# Altium PCB CarnLog-26.PcbDoc (part 2 of 4)
Units mm, origin at the board's own origin, x right, y up, seen from the top; angles counter-clockwise.
Board outline 109.83 x 61.93 mm, 6 copper layers (Sig/Pwr/Gnd-1, Gnd-2, Sig/Pwr/Gnd-3, Sig/Pwr/Gnd-4, Gnd-5, Sig/Pwr-6), stack 1.491 mm thick; 183 components, 128 nets, 802 pads, 490 vias.
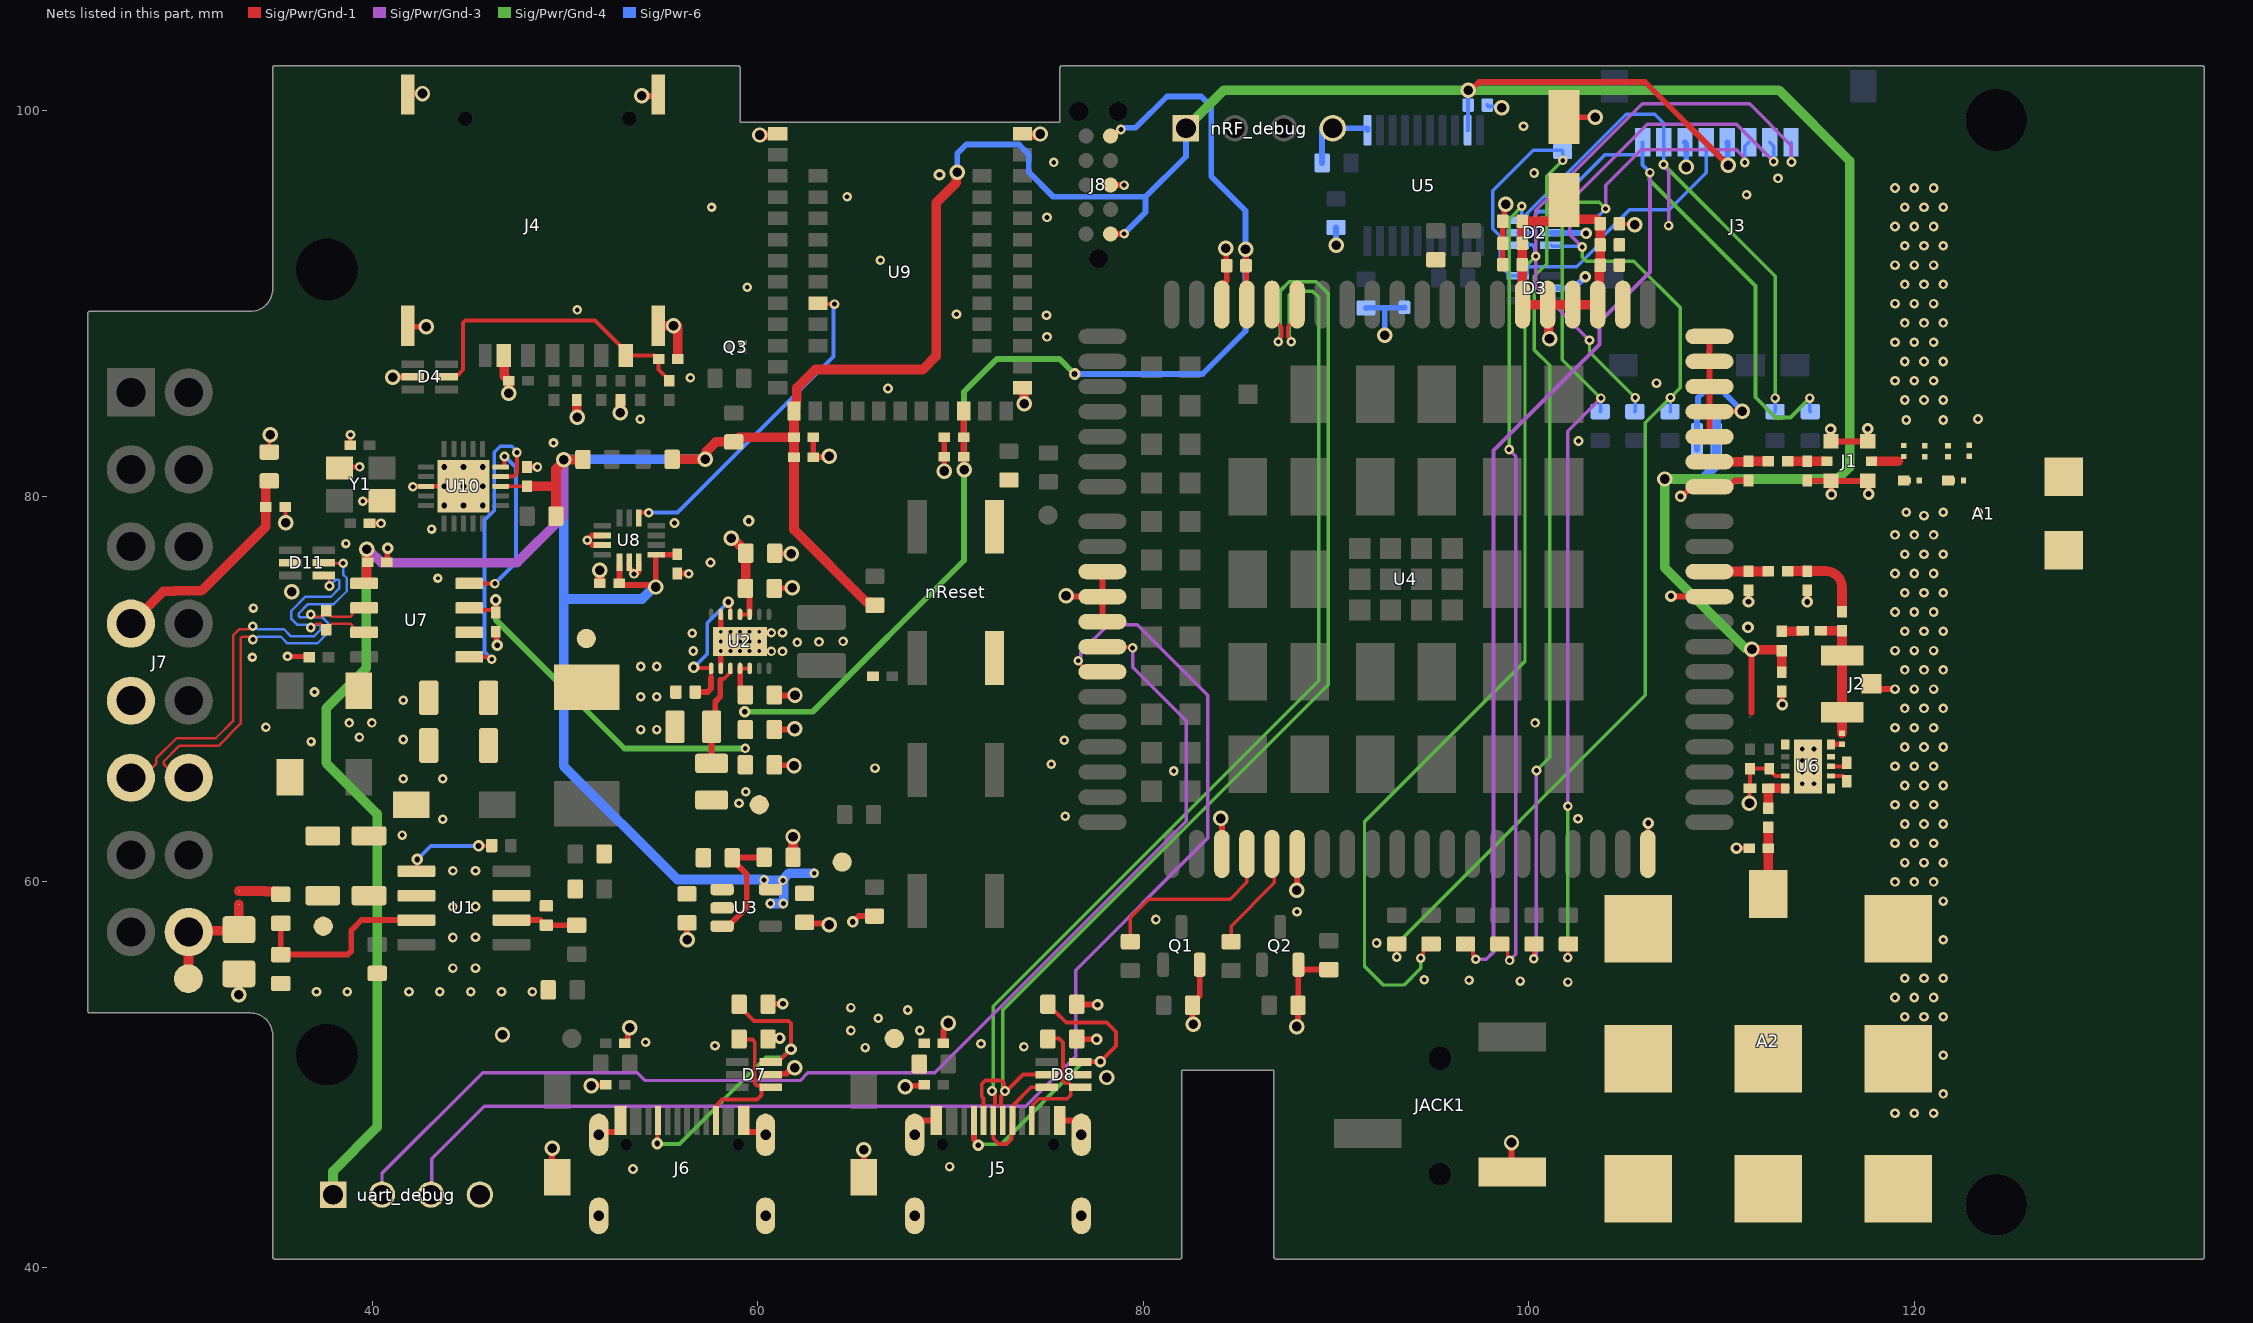
[diagram p6: the nets of this part, all layers, seen from the top]

## Part data
A1: library part P822601_1, "ANTENNA PRESTTA OCTABAND LTE", Manufacturer=Ethertronics, Part number IPS=00000009001, Part number NEMS=100700043, Part number Norautron=N.A., Artikkelnr Noca=N.A., Author=rsk, Component Class=Antennas, Component Status=Active, ComponentLink1Description=Datasheet, ComponentLink1URL=N.A., ComponentLink2Description="Supplier link", ComponentLink2URL=N.A., Footprint Doc=P822601, HelpURL=http://www.ethertronics.com/wp-content/uploads/2016/11/Prestta-P822601-P822602-Standard-Cellular-Octa-Band-20160904.pdf, LatestRevisionDate=2017-07-28, Manufacturer Part Number=P822601, Note=N.A., Pad Count=2, Part Number=P822601, PartId=100700043, Published=2017-07-28, Supplier 1=moreelectronics.dk, Supplier 2=Digi-Key, Supplier Part Number 1=P822601, Supplier Part Number 2=939-1057-1-ND
A2: library part DSGP.1575.18.4.C.02, "18 x 18 mm Low Profile GPS L1 / GALILEO E1 Passive Patch Antenna", Manufacturer=Taoglas, Part number IPS=00000007687, Part number NEMS=100700073, Part number Norautron=N.A., Artikkelnr Noca=N.A., Author=rubr, Component Class=Antennas, Component Status=Active, ComponentLink1Description=Datasheet, ComponentLink1URL=https://www.taoglas.com/datasheets/DSGP.1575.18.4.A.02.pdf, ComponentLink2Description="Supplier link", ComponentLink2URL=https://www.digikey.com/product-detail/en/taoglas-limited/DSGP.1575.18.4.A.02/931-1511-1-ND/8275289, Footprint Doc=DSGP.1575.18.4.C.02, HelpURL=https://www.taoglas.com/product/18184mm-dsgp-1575-184-gps-l1-galileo-e1-ceramic-patch-copy/?compare=16929, LatestRevisionDate=2023-01-01, Manufacturer Part Number=DSGP.1575.18.4.C.02, Note=N.A., Pad Count=2, Part Number=DSGP.1575.18.4.C.02, PartId=100700073, Published=2022-01-13, Supplier 1=N.A., Supplier 2=N.A., Supplier Part Number 1=N.A., Supplier Part Number 2=N.A.
C1 C16 C18 C23 C25 C27 C28 C46: library part CAP_0402, "Capacitor SMD 0402", LCSC NO=C77020, Manufacturer="Murata Electronics", MPN=GRM155R71H104KE14D, ComponentLink1Description="LCSC Link", ComponentLink1URL=https://lcsc.com/product-detail/Multilayer-Ceramic-Capacitors-MLCC-SMD-SMT_Murata-Electronics-GRM155R71H104KE14D_C77020.html?s_z=n_100nF
C2 C3 C4 C5: library part CAP_1206, "Capacitor SMD 1206"
C6 C8 C9 C10 C11 C12 C13 C14 C15 C26: library part CAP_0603, "Capacitor SMD 0603"
C7 C19 C20 C21 C22 C44 C45: library part CAP_0402, "Capacitor SMD 0402"
C17: library part CAP_0805, "Capacitor SMD 0805"
C24: library part EEEHA0J101WR, "CAPACITOR ALUM ELEC, 100UF, 20%, 6.3V, S; CAPACITOR ALUM ELEC, 100UF, 20%, 6.3V, SMD; Product Range:PANASONIC - HA Series; Capacitance:100ÂµF; Capacitance Tolerance:Â± 20%; Voltage Rating:6.3V; Capacitor Case Style:Radial Can - SMD; Diameter:5mm; Height:5.4mm; Series:HA", Package="RADIAL-2 Panasonic", Availability="In Stock", Check_prices=https://www.snapeda.com/parts/EEE-HA0J101WR/Panasonic%20Electronic%20Components/view-part/2733110/?ref=eda, MF="Panasonic Electronic", MP=EEE-HA0J101WR, Price=None, Purchase-URL=https://pricing.snapeda.com/search/part/EEE-HA0J101WR/?ref=eda, SnapEDA_Link=https://www.snapeda.com/parts/EEE-HA0J101WR/Panasonic%20Electronic%20Components/view-part/2733110/?ref=snap
C29: library part C0201-3.5p, "Capacitor, NP0, ±0.1pF, 25V", Manufacturer=Murata, Manufacturer Part Number=GJM0335C1H3R5BB01E, Part number IPS=00000001469, Part number NEMS=100200023, Part number Norautron=N.A., Artikkelnr Noca=N.A., Author=rsk, Component Class=Capacitors, Component Status=Active, ComponentLink1Description=Datasheet, ComponentLink1URL=N.A., ComponentLink2Description="Supplier link", ComponentLink2URL=N.A., Footprint Doc=0201, HelpURL=N.A., LatestRevisionDate=2019-02-22, Note=25V, Pad Count=2, Part Number=C0201-3.5p, PartId=100200023, Published=2019-02-22, Supplier 1=N.A., Supplier 2=N.A., Supplier Part Number 1=N.A., Supplier Part Number 2=N.A.
C30 C31 C40: library part C0402-N.C., "Not mounted", Manufacturer=N.A., Part number NEMS=100200105, Artikkelnr Noca=N.A., Assembly="Not mounted", Author=rsk, Component Class=Capacitors, Component Status=Active, ComponentLink1Description=Datasheet, ComponentLink1URL=N.A., ComponentLink2Description="Supplier link", ComponentLink2URL=N.A., Footprint Doc=0402, HelpURL=N.A., LatestRevisionDate=2009-05-08, Manufacturer Part Number=N.A., Note="Chip Cap", Pad Count=2, Part Number=C0402-N.C., Part number IPS=N.A., Part number Norautron=N.A., PartId=100200105, Published=2009-05-08, Supplier 1=N.A., Supplier 2=N.A., Supplier Part Number 1=N.A., Supplier Part Number 2=N.A.
C32 C33 C34: library part C0201-N.C., "Not mounted", Manufacturer=N.A., Part number NEMS=100200001, Artikkelnr Noca=N.A., Assembly="Not mounted", Author=rsk, Component Class=Capacitors, Component Status=Active, ComponentLink1Description=Datasheet, ComponentLink1URL=N.A., ComponentLink2Description="Supplier link", ComponentLink2URL=N.A., Footprint Doc=0201, HelpURL=N.A., LatestRevisionDate=2014-11-13, Manufacturer Part Number=N.A., Note="Chip Cap", Pad Count=2, Part Number=C0201-N.C., Part number IPS=N.A., Part number Norautron=N.A., PartId=100200001, Published=2014-11-13, Supplier 1=N.A., Supplier 2=N.A., Supplier Part Number 1=N.A., Supplier Part Number 2=N.A.
C35 C36 C38 C39 C41 C42 C43 C47 C48 C49 C50 C51 C52 C53 C54 C55 C56 C57 C58 C59 C60 C61 C62 C63 C64 C65 C66: library part C0402-4µ7, "Capacitor, X5R, ±20%", Manufacturer=N.A., Part number IPS="00000001251, 00000007165", Part number NEMS=100200193, Supplier Part Number 1=490-13252-1-ND, Artikkelnr Noca=20039482, Author=rsk, Component Class=Capacitors, Component Status=Active, ComponentLink1Description=Datasheet, ComponentLink1URL=N.A., ComponentLink2Description="Supplier link", ComponentLink2URL=N.A., Footprint Doc=0402, HelpURL=N.A., LatestRevisionDate=2017-11-09, Manufacturer Part Number=N.A., Note=10V, Pad Count=2, Part Number=C0402-4µ7, Part number Norautron=N.A., PartId=100200193, Published=2009-05-08, Supplier 1=Digi-Key, Supplier 2=N.A., Supplier Part Number 2=N.A.
C37: library part C0201-39p, "Capacitor, NP0, ±1%, 25V", Manufacturer=Murata, Manufacturer Part Number=GRM0335C1E390FA01, Part number IPS=00000001668, Part number NEMS=100200039, Part number Norautron=N.A., Artikkelnr Noca=N.A., Author=rsk, Component Class=Capacitors, Component Status=Active, ComponentLink1Description=Datasheet, ComponentLink1URL=N.A., ComponentLink2Description="Supplier link", ComponentLink2URL=N.A., Footprint Doc=0201, HelpURL=N.A., LatestRevisionDate=2019-04-16, Note=25V, Pad Count=2, Part Number=C0201-39p, PartId=100200039, Published=2019-04-16, Supplier 1=N.A., Supplier 2=N.A., Supplier Part Number 1=N.A., Supplier Part Number 2=N.A.
D1 D5 D6 D9 D10: library part "Schottky Diode_3", "Schottky Diode SMD SMAF package"
D2 D3 D4 D7 D8 D11: "Quint Uni-Directional TVS Diode, 100W, 6-Pin SC-88", Package="TSSOP-6 ProTek Devices", Availability="In Stock", Check_prices=https://www.snapeda.com/parts/SMF05C/Protek+Devices/view-part/?ref=eda, MF="ProTek Devices", MP=SMF05C, Price=None, SnapEDA_Link=https://www.snapeda.com/parts/SMF05C/Protek+Devices/view-part/?ref=snap
FB1 FB2: library part FB_0603, "Ferrite Bead SMD 0603"
J1: "Coaxial Connector with Switch", Manufacturer=Murata, Part number IPS=00000009955, Part number NEMS=100500400, Part number Norautron=26030338, Supplier Part Number 1=490-4981-1-ND, Artikkelnr Noca=55029011, Author=rsk, Component Class=Connectors, Component Status=Active, ComponentLink1Description=Datasheet, ComponentLink1URL=N.A., ComponentLink2Description="Supplier link", ComponentLink2URL=N.A., Footprint Doc=COAXIAL-SWF, HelpURL=http://www.murata.com/products/catalog/pdf/o33e.pdf, LatestRevisionDate=2014-04-24, Manufacturer Part Number=MM8130-2600, Note=N.A., Pad Count=3, Part Number=MM8130-2600, PartId=100500400, Published=2014-04-24, Supplier 1=Digi-Key, Supplier 2=Mouser, Supplier Part Number 2=81-MM8130-2600RA2, System=Connector
J2: library part 20279-001E-03, "Ultraminiature Coaxial Connector, 50 Ohm, SMD", Manufacturer=Wellshow, Part number IPS=00000004436, Part number NEMS=100500636, Part number Norautron=N.A., Artikkelnr Noca=N.A., Author=rsk, Component Class=Connectors, Component Status=Active, ComponentLink1Description=Datasheet, ComponentLink1URL=\\hizz\pro\app9717\Datasheet\connectors\Wellshow\20279C18.pdf, ComponentLink2Description="Supplier link", ComponentLink2URL=N.A., Footprint Doc="COAXIAL RF MHFI", HelpURL=N.A., LatestRevisionDate=2020-04-28, Manufacturer Part Number=20279-001E-03, Note=N.A., Pad Count=3, Part Number=20279-001E-03, PartId=100500636, Published=2020-01-07, Supplier 1=Cabcon, Supplier 2=Digi-Key, Supplier Part Number 1=20279-001E-03, Supplier Part Number 2=H11891DKR-ND, System=Connector
J3: "10 _8 + 2_ Position Card Connector Secure Digital - microSDâ„¢ Surface Mount, Right Angle Gold", Package=None, Availability=Unavailable, MF=Molex, MP=5025700893, Price=None, SnapEDA_Link=https://www.snapeda.com/parts/5025700893/Molex/view-part/379523/?ref=snap
J4: library part L-KLS1-SIM-066-(6+1)P-H1.37-R, "Nano SIM Card Connector, Push-Push, 6-Pin, H1.37mm, with CD Pin", Manufacturer="KLS Electronic", Part number IPS=N.A., Part number NEMS=100500776, Artikkelnr Noca=N.A., Author=rubr, Component Class=Connectors, Component Status=Active, ComponentLink1Description=Datasheet, ComponentLink1URL=https://klsele.com/admin/product_upload/20190123133741L-KLS1-SIM-066-(6+1)P-H1.37-R--.pdf, ComponentLink2Description="Supplier link", ComponentLink2URL=N.A., Footprint Doc=KLS1-SIM-066, HelpURL=https://klsele.com/products/connectors/SIM-card-connectors-Micro-SIM-card-connectors-Nano-SIM-Card-Connectors/4918.html, LatestRevisionDate=2023-01-01, Manufacturer Part Number=L-KLS1-SIM-066-(6+1)P-H1.37-R, Note=N.A., Pad Count=7, Part Number=L-KLS1-SIM-066-(6+1)P-H1.37-R, Part number Norautron=N.A., PartId=100500776, Published=2023-01-01, Supplier 1=Cabcon, Supplier 2=N.A., Supplier Part Number 1=L-KLS1-SIM-066-(6+1)P-H1.37-R, Supplier Part Number 2=N.A., System=Connector
J5 J6: "USB Type C Connector Horizontal SMT", Manufacturer="Koren Hroparts", Manufacturer Part Number=TYPE-C-31-M-12
J7: "OBD II 16pin 90 Degree Angle Male Plug Connector", Package=None, Check_prices=https://www.snapeda.com/parts/C-OBD-II-16M/Comtech+Electronic+Co.%252C+LTD/view-part/?ref=eda, MF="Comtech Electronic Co., LTD", MP=C-OBD-II-16M, SnapEDA_Link=https://www.snapeda.com/parts/C-OBD-II-16M/Comtech+Electronic+Co.%252C+LTD/view-part/?ref=snap
J8: library part TC2050-IDC-NLFP, "CBL PLUG-OF-NAILS 10-PIN", Manufacturer="Tag-Connect LLC", Part number IPS=N.A., Part number NEMS=100500463, Supplier Part Number 1=TC2050-IDC-NL-ND, Artikkelnr Noca=N.A., Author=rsk, Component Class=Connectors, Component Status=Active, ComponentLink1Description=Datasheet, ComponentLink1URL=N.A., ComponentLink2Description="Supplier link", ComponentLink2URL=N.A., Footprint Doc=TC2050-IDC-NLFP, HelpURL=http://www.tag-connect.com/Materials/TC2050-IDC%20Datasheet.pdf, LatestRevisionDate=2012-11-21, Manufacturer Part Number=TC2050-IDC-NLFP, Note=N.A., Pad Count=10, Part Number=TC2050-IDC-NLFP, Part number Norautron=N.A., PartId=100500463, Published=2012-11-21, Supplier 1=Digi-Key, Supplier 2=N.A., Supplier Part Number 2=N.A., System=Connector
JACK1: "3.5mm Headphone Jack SMD", LCSC NO=C18594, LCSC=https://lcsc.com/product-detail/Audio-Connectors_BOOMELE-Boom-Precision-Elec-PJ-320B_C18594.html?s_z=n_PJ320B, MF="Luoyang Dishang electronics", MP=PJ-320B
L1: library part ASPI-0630HI-6R8M-T15, "Inductor SMD 6.8uH 20% 8A Shielded", Manufacturer=ABRACON, Manufacturer Part Number=ASPI-0630HI-6R8M-T15
L2: library part IND_1008, "Inductor SMD 1008"
L3: library part L0201-1n5-HQ-Murata, "Inductor, 1000mA, ±0.1ｎH, 50mOhm", Manufacturer=Murata, Manufacturer Part Number=LQP03HQ1N5B02, Part number IPS=N.A., Part number NEMS=100300202, Supplier Part Number 1=490-13881-1-ND, Artikkelnr Noca=N.A., Author=rsk, Component Class=Inductors, Component Status=Active, ComponentLink1Description=Datasheet, ComponentLink1URL=https://search.murata.co.jp/Ceramy/image/img/P02/JELF243C-0021.pdf, ComponentLink2Description="Supplier link", ComponentLink2URL=N.A., Footprint Doc=0201, HelpURL=https://psearch.en.murata.com/inductor/product/LQP03HQ1N5B02%23.html, LatestRevisionDate=2018-10-23, Note="-55°C ~ 125°C", Pad Count=2, Part Number=L0201-1n5-HQ-Murata, Part number Norautron=N.A., PartId=100300202, Published=2018-10-23, Supplier 1=Digi-Key, Supplier 2=N.A., Supplier Part Number 2=N.A.
L4: library part L0201-22n, "Chip Inductor", Manufacturer=N.A., Part number IPS=00000001478, Part number NEMS=100300034, Artikkelnr Noca=N.A., Author=rsk, Component Class=Inductors, Component Status=Active, ComponentLink1Description=Datasheet, ComponentLink1URL=N.A., ComponentLink2Description="Supplier link", ComponentLink2URL=N.A., Footprint Doc=0201, HelpURL=N.A., LatestRevisionDate=2019-08-29, Manufacturer Part Number=N.A., Note="High frequency chip inductor ±10%", Pad Count=2, Part Number=L0201-22n, Part number Norautron=N.A., PartId=100300034, Published=2013-04-10, Supplier 1=N.A., Supplier 2=N.A., Supplier Part Number 1=N.A., Supplier Part Number 2=N.A.
L5: library part L0402-68n-Wirewound-Murata, "Inductor, 140mA, ±2%, 1960mΩ, Q=20", Manufacturer=Murata, Manufacturer Part Number=LQW15AN68NG00, Part number IPS=00000002494, Part number NEMS=100300389, Part number Norautron=N.A., Supplier Part Number 1=490-6837-1-ND, Artikkelnr Noca=N.A., Author=rsk, Component Class=Inductors, Component Status=Active, ComponentLink1Description=Datasheet, ComponentLink1URL=https://search.murata.co.jp/Ceramy/image/img/P02/JELF243A-0050.pdf, ComponentLink2Description="Supplier link", ComponentLink2URL=N.A., Footprint Doc=0402, HelpURL=https://psearch.en.murata.com/inductor/product/LQW15AN68NG00%23.html, LatestRevisionDate=2019-04-16, Note="-55°C ~ 125°C", Pad Count=2, Part Number=L0402-68n-Wirewound-Murata, PartId=100300389, Published=2019-04-16, Supplier 1=Digi-Key, Supplier 2=N.A., Supplier Part Number 2=N.A.
L6: library part L0402-9n1-Wirewound-Murata, "Inductor, 540mA, ±2%, 140mΩ, Q=25", Manufacturer=Murata, Manufacturer Part Number=LQW15AN9N1G00, Part number IPS=00000002497, Part number NEMS=100300357, Part number Norautron=N.A., Supplier Part Number 1=490-6854-1-ND, Artikkelnr Noca=N.A., Author=rsk, Component Class=Inductors, Component Status=Active, ComponentLink1Description=Datasheet, ComponentLink1URL=https://search.murata.co.jp/Ceramy/image/img/P02/JELF243A-0050.pdf, ComponentLink2Description="Supplier link", ComponentLink2URL=N.A., Footprint Doc=0402, HelpURL=https://psearch.en.murata.com/inductor/product/LQW15AN9N1G00%23.html, LatestRevisionDate=2019-04-16, Note="-55°C ~ 125°C", Pad Count=2, Part Number=L0402-9n1-Wirewound-Murata, PartId=100300357, Published=2019-04-16, Supplier 1=Digi-Key, Supplier 2=N.A., Supplier Part Number 2=N.A.
L7: library part L0402-N.C., "Not mounted", Manufacturer=N.A., Part number NEMS=100300037, Artikkelnr Noca=N.A., Assembly="Not mounted", Author=rsk, Component Class=Inductors, Component Status=Active, ComponentLink1Description=Datasheet, ComponentLink1URL=N.A., ComponentLink2Description="Supplier link", ComponentLink2URL=N.A., Footprint Doc=0402, HelpURL=N.A., LatestRevisionDate=2016-11-24, Manufacturer Part Number=N.A., Note=N.A., Pad Count=2, Part Number=L0402-N.C., Part number IPS=N.A., Part number Norautron=N.A., PartId=100300037, Published=2016-11-24, Supplier 1=N.A., Supplier 2=N.A., Supplier Part Number 1=N.A., Supplier Part Number 2=N.A.
N_STS1 STS1: library part LED_0603_RED, "LED 0603 RED SMD"
nReset usb_boot: "White Push Plate Tactile Switch, SPST-NO 20 mA 3.1mm", Package=None, Availability="In Stock", Check_prices=https://www.snapeda.com/parts/EVQQ2W03W/Panasonic/view-part/?ref=eda, MF=Panasonic, MP=EVQQ2W03W, Price=None, SnapEDA_Link=https://www.snapeda.com/parts/EVQQ2W03W/Panasonic/view-part/?ref=snap
nRF_debug uart_debug: library part 4PIN_TSW-104-08-T-S-LL, Package=None, Availability=Unavailable, MF=Samtec, MP=TSW-104-08-T-S-LL, Price=None
nRF_LED: library part LED_0603_BLUE, "LED 0603 BLUE SMD"
Q1 Q2: "NPN SMALL SIGNAL SURFACE MOUNT TRANSISTOR", Package=None, Availability=Unavailable, MP=MMBT3904-7-F, Price=None
Q3: "N-Channel MOSFET, 20V, 1A, 470mOhm, 400mW", Manufacturer="Rohm Semiconductor", Part number IPS=00000009976, Part number NEMS=101300132, Part number Norautron=26320026, Supplier Part Number 1=RV2C010UNT2LCT-ND, Artikkelnr Noca=35010020, Author=rsk, Component Class=Semiconductors, Component Status=Active, ComponentLink1Description=Datasheet, ComponentLink1URL=N.A., ComponentLink2Description="Supplier link", ComponentLink2URL=N.A., Footprint Doc=DFN-3, HelpURL=http://rohmfs.rohm.com/en/products/databook/datasheet/discrete/transistor/mosfet/rv2c010unt2l-e.pdf, LatestRevisionDate=2016-08-09, Manufacturer Part Number=RV2C010UNT2L, Note=N.A., Pad Count=3, Part Number=RV2C010UNT2L, PartId=101300132, Published=2016-08-09, Supplier 1=Digi-Key, Supplier 2=Mouser, Supplier Part Number 2=755-RV2C010UNT2L
R1 R2 R3 R4 R5 R6 R8 R10 R11 R12 R13 R14 R15 R16 R17 R19 R20 R21 R22 R26 R27 R28 R29 R30 R31 R32 R33 R34 R35 R36 R37 R42 R43 R44 R45 R46 R47 R53 R54 R55 R56: library part RES_0603, "Resistor SMD 0603"
R7 R9: library part RES_0805, "Resistor SMD 0805"
R18 R23 R24 R25 R38 R39 R40 R41 R48 R52: library part R0402-0R, "Resistor, ±5%, 0.063W", Manufacturer=N.A., Part number IPS=00000007128, Part number NEMS=100100109, Supplier Part Number 1=146-9661, Artikkelnr Noca=27049000, Author=rsk, Component Class=Resistors, Component Status=Active, ComponentLink1Description=Datasheet, ComponentLink1URL=N.A., ComponentLink2Description="Supplier link", ComponentLink2URL=N.A., Footprint Doc=0402, HelpURL=N.A., LatestRevisionDate=2009-11-23, Manufacturer Part Number=N.A., Note="Chip Res 5%", Pad Count=2, Part Number=R0402-0R, Part number Norautron=N.A., PartId=100100109, Published=2009-05-08, Supplier 1=Farnell, Supplier 2=N.A., Supplier Part Number 2=N.A.
SB1: library part "Solderbridge Shorted", "Shorted Solderbridge", Manufacturer=N.A., Part number NEMS=100500459, Artikkelnr Noca=N.A., Author=rsk, Component Class=Connectors, Component Status=Active, ComponentLink1Description=Datasheet, ComponentLink1URL=N.A., ComponentLink2Description="Supplier link", ComponentLink2URL=N.A., Footprint Doc=Solderbridge_Shorted, HelpURL=N.A., LatestRevisionDate=2012-08-07, Manufacturer Part Number=N.A., Note=N.A., Pad Count=2, Part Number="Solderbridge Shorted", Part number IPS=N.A., Part number Norautron=N.A., PartId=100500459, Published=2012-08-07, Supplier 1=N.A., Supplier 2=N.A., Supplier Part Number 1=N.A., Supplier Part Number 2=N.A., System=Connector
SB2 SB3 SB4: Manufacturer=N.A., Part number NEMS=100500458, Artikkelnr Noca=N.A., Author=rsk, Component Class=Connectors, Component Status=Active, ComponentLink1Description=Datasheet, ComponentLink1URL=N.A., ComponentLink2Description="Supplier link", ComponentLink2URL=N.A., Footprint Doc=Solderbridge, HelpURL=N.A., LatestRevisionDate=2009-12-14, Manufacturer Part Number=N.A., Note=N.A., Pad Count=2, Part Number=Solderbridge, Part number IPS=N.A., Part number Norautron=N.A., PartId=100500458, Published=2009-12-14, Supplier 1=N.A., Supplier 2=N.A., Supplier Part Number 1=N.A., Supplier Part Number 2=N.A., System=Connector
TP1 TP2 TP5 TP6 TP9 TP10 TP11: library part TP_SMD_Ø1.0MM, "1.0mm circular SMD testpad", Manufacturer="Nordic Semiconductor", Manufacturer Part Number=N.A., Part number NEMS=100500475, Artikkelnr Noca=N.A., Author=rsk, Component Class=Connectors, Component Status=Active, ComponentLink1Description=Datasheet, ComponentLink1URL=N.A., ComponentLink2Description="Supplier link", ComponentLink2URL=N.A., Footprint Doc=TP_SMD_Ø1.0mm, HelpURL=N.A., LatestRevisionDate=2021-03-05, Note=N.A., Pad Count=1, Part Number=TP_SMD_Ø1.0MM, Part number IPS=N.A., Part number Norautron=N.A., PartId=100500475, Published=2013-06-11, Supplier 1=N.A., Supplier 2=N.A., Supplier Part Number 1=N.A., Supplier Part Number 2=N.A.
TP14: library part TP_SMD_Ø1.5MM, "1.5mm circular SMD testpad", Manufacturer="Nordic Semiconductor", Manufacturer Part Number=N.A., Part number NEMS=100500477, Artikkelnr Noca=N.A., Author=rsk, Component Class=Connectors, Component Status=Active, ComponentLink1Description=Datasheet, ComponentLink1URL=N.A., ComponentLink2Description="Supplier link", ComponentLink2URL=N.A., Footprint Doc=TP_SMD_Ø1.5mm, HelpURL=N.A., LatestRevisionDate=2021-03-05, Note=N.A., Pad Count=1, Part Number=TP_SMD_Ø1.5MM, Part number IPS=N.A., Part number Norautron=N.A., PartId=100500477, Published=2016-06-02, Supplier 1=N.A., Supplier 2=N.A., Supplier Part Number 1=N.A., Supplier Part Number 2=N.A.
U2: "High Efficiency Single Inductor Buck-Boost Converter with 4A Switch", Package="VSON-14 Texas Instruments", Check_prices=https://www.snapeda.com/parts/TPS63020DSJT/Texas+Instruments/view-part/?ref=eda, MF="Texas Instruments", MP=TPS63020DSJT, SnapEDA_Link=https://www.snapeda.com/parts/TPS63020DSJT/Texas+Instruments/view-part/?ref=snap
U3: "1-A, low-IQ, high-accuracy, low-dropout voltage regulator with enable", Package="SOT-23-5 Texas Instruments", Availability="In Stock", Check_prices=https://www.snapeda.com/parts/TLV75733PDBVR/Texas+Instruments/view-part/?ref=eda, MF="Texas Instruments", MP=TLV75733PDBVR, Price=None, Purchase-URL=https://pricing.snapeda.com/search/part/TLV75733PDBVR/?ref=eda, SnapEDA_Link=https://www.snapeda.com/parts/TLV75733PDBVR/Texas+Instruments/view-part/?ref=snap
U4: "Quectel 4G LTE Cat 1 wireless BT GNSS module", Package=None, Check_prices=https://www.snapeda.com/parts/EC200UCNAA-N05-SGNSA/Quectel/view-part/?ref=eda, MF=Quectel, MP=EC200UCNAA-N05-SGNSA, SnapEDA_Link=https://www.snapeda.com/parts/EC200UCNAA-N05-SGNSA/Quectel/view-part/?ref=snap
U5: "8-bit bidirectional voltage-level shifter for open-drain and push-pull application", Package="TSSOP-20 Texas Instruments", Availability="In Stock", Check_prices=https://www.snapeda.com/parts/TXS0108EPWR/Texas+Instruments/view-part/?ref=eda, MF="Texas Instruments", MP=TXS0108EPWR, Price=None, Purchase-URL=https://pricing.snapeda.com/search/part/TXS0108EPWR/?ref=eda, SnapEDA_Link=https://www.snapeda.com/parts/TXS0108EPWR/Texas+Instruments/view-part/?ref=snap
U6: "GNSS Low-Noise Amplifier Front-End Module with Integrated Pre-Filter and Post-Filter", Manufacturer=Skyworks, Part number IPS=00000002997, Part number NEMS=101900584, Part number Norautron=N.A., Supplier Part Number 1=863-2032-1-ND, Artikkelnr Noca=N.A., Author=rsk, Component Class=Misc_ICs, Component Status=Active, ComponentLink1Description=Datasheet, ComponentLink1URL=http://www.skyworksinc.com/uploads/documents/SKY65943_11_204404F.pdf, ComponentLink2Description="Supplier link", ComponentLink2URL=https://www.digikey.com/product-detail/en/skyworks-solutions-inc/SKY65943-11/863-2032-1-ND, Footprint Doc=MCM-10, HelpURL=http://www.skyworksinc.com/Product/3579/SKY65943-11, LatestRevisionDate=2019-04-16, Manufacturer Part Number=SKY65943-11, Note=N.A., Pad Count=10, Part Number=SKY65943-11, PartId=101900584, Published=2019-04-16, Supplier 1=Digi-Key, Supplier 2=Mouser, Supplier Part Number 2=873-SKY65943-11
U7: "5Mbps CAN Transceiver SOIC-8 CAN Transceivers ROHS"
U8: "Accelerometer, Gyroscope, 6 Axis Sensor I2C, SPI Output", Package="VFLGA-14 STMicroelectronics", Check_prices=https://www.snapeda.com/parts/LSM6DSOTR/STMicroelectronics/view-part/?ref=eda, MF=STMicroelectronics, MP=LSM6DSOTR, SnapEDA_Link=https://www.snapeda.com/parts/LSM6DSOTR/STMicroelectronics/view-part/?ref=snap
U9: "Holyiot 18010 Nordic nRF52840 module Bluetooth low energy module", Package=Package, Check_prices=https://www.snapeda.com/parts/HOLYIOT-18010-NRF52840/Holyiot/view-part/?ref=eda, MF=Holyiot, MP=HOLYIOT-18010-NRF52840, SnapEDA_Link=https://www.snapeda.com/parts/HOLYIOT-18010-NRF52840/Holyiot/view-part/?ref=snap
U10: "Microchip MCP2515-I/ML, CAN Controller 1Mbit/s CAN 2.0B, 20-Pin QFN", Package="VFQFN-20 Microchip", Check_prices=https://www.snapeda.com/parts/MCP2515-I/ML/Microchip+Technology/view-part/?ref=eda, MF="Microchip Technology", MP=MCP2515-I/ML, SnapEDA_Link=https://www.snapeda.com/parts/MCP2515-I/ML/Microchip+Technology/view-part/?ref=snap
Y1: library part C3E-8.000-18-3030-X-R, "Crystal, 3.20mm x2.50mm,8MHz,18pF,-40-85C", Package="SMD-4 Aker", Check_prices=https://www.snapeda.com/parts/C3E-8.000-18-3030-X-R/Aker/view-part/?ref=eda, MF="Aker Technology USA", MP=C3E-8.000-18-3030-X-R, SnapEDA_Link=https://www.snapeda.com/parts/C3E-8.000-18-3030-X-R/Aker/view-part/?ref=snap

## Free pads (board coordinates)
  round 3.2 hole 3.2 unplated: 1(37.65,91.775) 2(37.65,51.025) 3(124.25,43.25) 4(124.25,99.525)

## Via types
v1: diameter 0.5, hole 0.25, Sig/Pwr/Gnd-1 to Sig/Pwr-6, tented both sides, 370 vias
v2: diameter 0.8, hole 0.5, Sig/Pwr/Gnd-1 to Sig/Pwr-6, tented both sides, 64 vias
v3: diameter 0.6, hole 0.3, Sig/Pwr/Gnd-1 to Sig/Pwr-6, tented both sides, 46 vias
v4: diameter 0.5, hole 0.2, Sig/Pwr/Gnd-1 to Sig/Pwr-6, tented both sides, 10 vias

## Nets (pads, with @x,y where several pads share a name; then routed paths per layer and width w, separated by ;. In a path a pad name is that pad's centre, name@x,y a point inside that pad or via, vN(x,y) a via of type N, cw(c..) or ccw(c..) an arc to the next point about the centre after c; other vN are vias at no path point)
+3V3: C14.2 C28.2 C35.2 C44.2 C45.2 C46.2 C57.2 C58.2 C59.2 C61.1 C63.2 C64.2 J3.4 J8.1 nRF_debug.01 R23.2 R46.2 R47.1 R54.2 R55.2 R56.1 SB1.1 TP6.1 U3.5 U5.19 U7.5 U8.5 U8.8 U9.14 U10.18 uart_debug.01 | length 274
  Sig/Pwr/Gnd-1 w0.2: U10.18@46.66,80.525 C59.2@48.025,80.525
  Sig/Pwr/Gnd-1 w0.3: U8.5@52.825,76.575 52.825,75.525 C58.2@52.8,75.5 52.9,75.4 54.465,75.4 54.565,75.3 v2(54.7,75.3) U8.8@54.7,76.975 ; U8.8@54.675,76.975 U8.8@54.7,76.975 ; C61.1@55.825,77 55.8,76.975 U8.8@54.725,76.975 U8.8@54.7,76.975 ; J8.1@78.3,93.615 78.305,93.62 78.995,93.62 v1(79,93.625) ; v2(96.85,101.075) 96.985,101.075 97.41,101.5 106.025,101.5 v2(110.35,97.175) ; 111.55,68.775 v2@111.55,72.05
  Sig/Pwr/Gnd-1 w0.5: U7.5@39.575,75.483 39.65,75.483 39.7,75.533 39.7,76.575 39.725,76.575 39.725,77.225 v2(39.7,77.25) ; C59.2@48.069,80.535 48.269,80.535 49.525,80.528 ; R56.1@49.525,78.975 49.525,80.528 ; R55.2@50.925,81.919 50.915,81.91 49.936,81.91 v2(49.927,81.9) 49.927,81.819 49.525,81.417 49.525,80.528 ; R54.2@55.55,81.925 v2(57.275,81.925) 57.332,81.982 57.332,82.332 57.825,82.825 R46.2@58.75,82.825 59,83.075 C64.2@61.875,83.075 ; R47.1@66.075,74.35 65.925,74.5 65.65,74.5 61.875,78.275 C63.2@61.875,82.025 C64.2@61.875,83.075 ; v2(70.35,96.825) 70.299,96.774 70.299,96.274 69.25,95.225 69.25,87.275 68.556,86.581 62.982,86.581 62.025,85.624 62.025,84.968 61.975,84.918 61.975,84.525 U9.14@61.875,84.425 C64.2@61.875,83.075 ; v2@111.55,72.05 v2(111.575,72.075) 111.612,72.037 113.1,72.037 113.125,72.012 R23.2@113.125,72 C35.2@113.125,70.875
  Sig/Pwr/Gnd-3 w0.5: v2@39.744,77.193 39.839,77.193 40.471,76.56 47.511,76.56 49.903,78.951 49.903,81.876 v2(49.927,81.9)
  Sig/Pwr/Gnd-4 w0.5: uart_debug.01@37.96,43.775 37.96,44.985 40.25,47.275 40.25,63.525 37.6,66.175 37.6,69 39.686,71.086 v2@39.686,77.264 ; nRF_debug.01@81.824,98.724 81.834,98.724 nRF_debug.01@82.21,99.1 82.645,99.535 82.645,99.545 84.175,101.075 v2(96.85,101.075) 112.975,101.075 116.65,97.4 116.65,81.525 116.025,80.9 v2(107.05,80.9) 107.05,76.3 111.218,72.132 111.518,72.132 v2(111.575,72.075)
  Sig/Pwr-6 w0.2: U5.19@96.825,98.995 96.837,99.007 96.837,100.287 C28.2@96.85,100.3 v2(96.85,101.075)
  Sig/Pwr-6 w0.3: v2(70.35,96.825) 70.35,97.789 70.811,98.25 73.55,98.25 74.05,97.75 74.05,96.825 75.325,95.55 78.867,95.55 78.876,95.541 80.116,95.541 ; v1(79,93.625) 80.116,94.741 80.116,95.541 ; nRF_debug.01@82.21,99.1 82.21,97.635 80.116,95.541 ; J3.4@110.3,98.375 110.325,98.35 110.325,97.2 v2(110.35,97.175)
  Sig/Pwr-6 w0.5: v2(49.927,81.9) 49.927,74.674 ; v2@49.952,81.925 v2(57.275,81.925) ; v2(54.7,75.3) 54.619,75.3 53.993,74.674 49.927,74.674 ; v1(60.65,58.875) v1(61.325,58.875) 61.35,58.9 61.35,60.025 v1(61.3,60.075) ; v1(62.925,60.45) 61.625,60.45 61.3,60.125 v1(61.3,60.075) ; v2(107.05,80.9) 109,80.9 109.725,81.625 C46.2@109.725,82.425 C45.2@109.725,83.45 C44.2@109.725,84.425 ; 49.927,74.674 49.927,66.023 55.827,60.123 60.302,60.123 v1(60.325,60.1) 60.375,60.1 60.4,60.075 v1(61.3,60.075)
+4V: C4.2 C5.2 C9.2 C10.2 C15.2 C18.2 C19.2 C20.2 C21.2 C22.2 C23.2 C24.1 L1.2 R2.2 R6.2 TP2.1 U2.10 U2.11 U3.1 U4.57 U4.58 U4.59 U4.60 | length 24.8
  Sig/Pwr/Gnd-1 w0.2: U2.11@59.075,73.875 U2.10@59.575,73.875 U2.10@59.567,73.883 ; C10.2@59.35,75.225 C10.2@59.567,75.008
  Sig/Pwr/Gnd-1 w0.3: U2.10@59.567,73.883 C10.2@59.567,75.008
  Sig/Pwr/Gnd-1 w0.5: v2(58.625,77.825) 58.7,77.825 59.375,77.15 C9.2@59.375,77.05 59.363,77.038 59.363,75.238 C10.2@59.35,75.225 ; v2(101.075,88.175) 101.025,88.225 101.025,89.9 U4.59@100.975,89.95 ; U4.59@100.975,89.95 U4.60@99.675,89.95 99.663,89.963 99.663,92.013 C21.2@99.65,92.025 C22.2@99.65,93.125 C23.2@99.65,94.275 101.275,94.275 101.825,94.825 C24.1@101.825,95.375 101.825,94.922 102.375,94.372 103.528,94.372 103.7,94.2 C18.2@103.7,94.15 C19.2@103.7,93.05 C20.2@103.7,92 103.655,91.955 103.655,90.961 103.575,90.881 U4.57@103.575,89.95 U4.58@102.275,89.95 U4.59@100.975,89.95
+5V: C11.2 C12.2 C13.2 C25.1 C56.1 C65.2 C66.2 J8.5 R7.1 TP5.1 U2.4 U2.5 U4.71 U7.3 U9.22 | length 85.4
  Sig/Pwr/Gnd-1 w0.2: U7.3@45.025,74.213 45.127,74.11 46.265,74.11 C56.1@46.4,73.975 ; C11.2@59.083,69.967 C11.2@59.35,69.7 ; U2.4@59.083,71.067 U2.4@59.075,71.075 U2.5@59.575,71.075
  Sig/Pwr/Gnd-1 w0.3: C56.1@46.4,73.975 46.403,73.978 46.403,74.623 v3(46.405,74.625) ; C11.2@59.083,69.967 U2.4@59.083,71.067 ; U9.22@70.675,84.425 C65.2@70.675,83.075 C66.2@70.675,82.05 70.688,82.038 70.688,81.388 v2(70.7,81.375) ; J8.5@78.3,98.695 78.432,98.695 78.731,98.994 78.798,98.994 v1(78.836,99.033) ; v2(85.302,92.827) 85.339,92.79 85.339,89.986 U4.71@85.375,89.95
  Sig/Pwr/Gnd-4 w0.3: v3(46.405,74.625) 46.4,74.62 46.4,73.6 53.075,66.925 v1(59.35,66.925) ; v3(59.325,68.825) 62.85,68.825 70.7,76.675 v2(70.7,81.375) 70.7,85.425 72.4,87.125 75.657,87.125 v3(76.432,86.35)
  Sig/Pwr-6 w0.3: v3(76.432,86.35) 83.075,86.35 85.302,88.577 v2(85.302,92.827) 85.302,94.817 83.525,96.594 83.525,100.225 83,100.75 81.225,100.75 79.595,99.12 78.978,99.12 78.89,99.033 v1(78.836,99.033)
  other v1: 59.025,64.075 59.375,64.675
+VIN: C2.2 C3.2 D10.K R1.2 SB2.1 TP1.1 U1.2 | length 2.2
  Sig/Pwr/Gnd-1 w0.5: SB2.1@33.075,59.525 34.45,59.525 34.475,59.5 35.1,59.5 R1.2@35.25,59.35
+VOBD2: C17.2 J7.16 SB2.2 TP14.1 | length 6.4
  Sig/Pwr/Gnd-1 w0.5: TP14.1@30.45,54.975 30.462,54.987 30.462,57.388 J7.16@30.475,57.4 30.534,57.459 33.016,57.459 C17.2@33.075,57.518 SB2.2@33.075,58.825
AG_CAP: C36.2 C39.2 R24.1 | length 4.6
  Sig/Pwr/Gnd-1 w0.5: R24.1@113.425,76.125 C39.2@114.45,76.125 115.4,76.125 cw(c115.4,75.275) 116.25,75.275 C36.2@116.25,74.025
AG_CONN: C36.1 C37.1 J2.2 L5.1 | length 6.4
  Sig/Pwr/Gnd-1 w0.5: L5.1@115.15,73.025 C36.1@116.25,73.025 J2.2@116.25,71.75 J2.2@116.25,68.8 C37.1@116.25,67.71
AG_IN: A2.1 C40.2 R25.2 | length 3.5
  Sig/Pwr/Gnd-1 w0.5: A2.1@112.425,59.375 C40.2@112.425,61.75 R25.2@112.425,62.825
AG_IND: L5.2 R23.1 | length 1.1
  Sig/Pwr/Gnd-1 w0.5: R23.1@113.125,73 114.175,73 ccw(c114.175,73.025) L5.2@114.2,73.025
AG_LNA_I: L7.2 R25.1 U6.5 | length 1.9
  Sig/Pwr/Gnd-1 w0.5: R25.1@112.425,63.825 L7.2@112.425,64.85 U6.5@113.3,64.85
AG_LNA_O: C37.2 U6.10 | length 0.6
  Sig/Pwr/Gnd-1 w0.3: U6.10@115.675,67.137 116.25,67.137 C37.2@116.25,67.14
AM_CAP: A1.3 C29.1 C33.2 C34.2 L3.2
AM_CONN: C31.2 J1.3 R18.2 | length 2
  Sig/Pwr/Gnd-1 w0.5: R18.2@113.425,81.825 C31.2@114.45,81.825 J1.3@115.465,81.825
AM_I/O: A1.1 C29.2 L4.1
AM_IND: A1.4 C32.2 J1.1 L3.1 | length 1.6
  Sig/Pwr/Gnd-1 w0.2: 119.15,81.825 119.35,81.825
  Sig/Pwr/Gnd-1 w0.5: J1.1@117.785,81.825 119.15,81.825
AMP_IN: L6.2 U6.8 | length 0.9
  Sig/Pwr/Gnd-1 w0.2: U6.8@115.675,65.994 116.35,65.994 116.5,66.143 L6.2@116.5,66.175
ANT_GNSS: C38.2 R24.2 U4.47 | length 3
  Sig/Pwr/Gnd-1 w0.5: U4.47@109.375,76.1 C38.2@111.375,76.1 ; C38.2@111.4,76.102 R24.2@112.406,76.102
ANT_MAIN: C30.2 R18.1 U4.49 | length 3
  Sig/Pwr/Gnd-1 w0.5: U4.49@109.375,81.8 C30.2@111.375,81.8 ; C30.2@111.4,81.825 R18.1@112.425,81.825
BOOT: C1.2 U1.1 | length 4.8
  Sig/Pwr/Gnd-1 w0.2: U1.1@42.28,60.555 42.329,60.604 v3(42.329,61.168) ; v3(45.513,61.865) 45.523,61.875 46.177,61.875 C1.2@46.187,61.885
  Sig/Pwr-6 w0.2: v3(42.329,61.168) 43.027,61.865 v3(45.513,61.865)
C_GND: C43.2 J7.4 R53.1 | length 11.5
  Sig/Pwr/Gnd-1 w0.5: J7.4@27.475,73.4 29.15,75.075 29.746,75.075 29.771,75.1 31.13,75.1 34.475,78.445 C43.2@34.475,79.45 34.475,80.65 34.625,80.8 R53.1@34.65,80.8
CAN_RX: U7.4 U10.20 | length 9.4
  Sig/Pwr/Gnd-1 w0.2: U7.4@45.025,75.483 46.347,75.483 v1(46.355,75.475) ; U10.20@46.66,81.525 46.822,81.525 46.852,81.555 v1(46.852,82.068)
  Sig/Pwr-6 w0.2: v1(46.355,75.475) 47.45,76.57 47.45,81.5 46.882,82.068 v1(46.852,82.068)
CAN_TX: U7.1 U10.19 | length 15.8
  Sig/Pwr/Gnd-1 w0.2: U7.1@45.025,71.673 46.07,71.673 v1(46.192,71.551) ; U10.19@46.66,81.025 47.325,81.025 47.5,81.2 v1(47.5,82.275)
  Sig/Pwr-6 w0.2: v1(46.192,71.551) 45.825,71.918 45.825,78.781 46.083,79.04 46.088,79.04 46.325,79.276 46.325,81.7 46.322,81.703 46.322,82.287 46.633,82.598 47.233,82.598 47.5,82.331 v1(47.5,82.275)
CANH_N: D11.5 J7.14 R52.2 U7.6 | length 27.3
  Sig/Pwr/Gnd-1 w0.13: J7.14@30.475,65.4 29.89,65.4 29.165,66.125 29.165,66.233 30.002,67.07 32.032,67.07 33.169,68.206 33.169,72.644 33.253,72.728 33.546,72.728 33.7,72.575 v1(33.8,72.575) ; v1(36.8,73.875) 36.9,73.875 37.01,73.765 37.315,73.765 R52.2@37.6,74.05 ; D11.5@37.468,76.55 37.488,76.53 v1(38.48,76.53) ; R52.2@37.6,74.075 R52.2@37.6,74.05 ; U7.6@39.575,74.213 39.181,74.213 38.947,73.978 38.947,73.844 38.871,73.768 38.606,73.768 38.603,73.765 37.885,73.765 R52.2@37.6,74.05
  Sig/Pwr-6 w0.13: v1(33.8,72.575) 33.9,72.575 34.054,72.728 35.245,72.728 35.603,72.37 37.142,72.37 37.701,72.929 37.701,73.426 37.402,73.725 37.05,73.725 36.9,73.875 36.7,73.875 36.55,73.725 36.25,73.725 36.174,73.801 36.174,73.909 36.671,74.406 37.998,74.406 38.671,75.079 38.671,75.763 38.48,75.954 v1(38.48,76.53)
CANH_P: D11.4 J7.6 R52.1 U7.7 | length 26.8
  Sig/Pwr/Gnd-1 w0.13: J7.6@27.475,65.4 28.06,65.4 28.785,66.125 28.785,66.39 29.845,67.45 31.875,67.45 32.789,68.364 32.789,72.801 33.096,73.108 33.543,73.108 33.697,73.262 v1(33.797,73.262) ; v1(36.8,73.195) 36.9,73.195 37.09,73.385 37.315,73.385 R52.1@37.6,73.1 ; D11.4@37.468,75.9 37.64,75.9 37.775,75.765 v1(37.775,75.35) ; R52.1@37.6,73.075 R52.1@37.6,73.1 ; U7.7@39.575,72.943 39.181,72.943 38.947,73.177 38.947,73.311 38.871,73.388 38.763,73.388 38.761,73.385 37.885,73.385 R52.1@37.6,73.1
  Sig/Pwr-6 w0.13: v1(33.797,73.262) 33.897,73.262 34.05,73.108 35.402,73.108 35.761,72.75 36.984,72.75 37.321,73.087 37.321,73.269 37.245,73.345 37.05,73.345 36.9,73.195 36.7,73.195 36.55,73.345 36.093,73.345 35.794,73.644 35.794,74.066 36.513,74.786 37.84,74.786 38.291,75.237 38.291,75.606 38.215,75.682 38.107,75.682 v1(37.775,75.35)
CC1: D7.3 J6.A5 R43.2 | length 16
  Sig/Pwr/Gnd-1 w0.2: v3(54.775,46.425) 54.8,46.45 54.8,47.6 J6.A5@54.825,47.625 ; R43.2@59.025,53.65 59.025,53.55 59.325,53.25 59.33,53.25 59.805,52.775 61.601,52.775 61.718,52.658 v3(61.718,51.316) 61.155,50.752 61.155,50.75 61.055,50.65 D7.3@60.67,50.65
  Sig/Pwr/Gnd-4 w0.2: v3(54.775,46.425) 54.797,46.403 55.928,46.403 60.429,50.903 61.282,50.903 61.694,51.316 v3(61.718,51.316)
CC1_EC: D8.3 J5.A5 R44.2 | length 16.5
  Sig/Pwr/Gnd-1 w0.2: R44.2@75.05,53.65 75.05,53.55 75.35,53.25 75.45,53.25 76,52.7 78.1,52.7 78.575,52.225 78.575,51.475 v3(77.775,50.675) 77.763,50.663 76.733,50.663 D8.3@76.72,50.65
  Sig/Pwr/Gnd-1 w0.3: J5.A5@71.209,47.444 71.209,46.64 71.431,46.418 v3(71.431,46.337)
  Sig/Pwr/Gnd-4 w0.2: v3(71.431,46.337) 71.477,46.383 72.608,46.383 76.9,50.675 v3(77.775,50.675)
CC2: D7.1 J6.B5 R42.2 | length 7.8
  Sig/Pwr/Gnd-1 w0.2: J6.B5@57.825,47.625 57.875,47.675 57.875,48.429 58.146,48.7 59.95,48.7 60.185,48.935 60.185,49.25 D7.1@60.285,49.35 ; R42.2@59.025,51.85 59.05,51.825 59.718,51.825 59.835,51.708 59.835,49.559 59.952,49.441 60.185,49.441 60.185,49.35 D7.1@60.67,49.35
CC2_EC: D8.1 J5.B5 R45.2 | length 7.4
  Sig/Pwr/Gnd-1 w0.2: J5.B5@74.209,47.625 74.259,47.675 74.259,48.429 74.58,48.75 76.05,48.75 76.235,48.935 76.235,49.25 D8.1@76.335,49.35 ; R45.2@75.05,51.85 75.075,51.875 75.625,51.875 75.828,51.672 75.828,49.667 75.945,49.55 76.135,49.55 D8.1@76.335,49.35 ; D8.1@76.72,49.35 D8.1@76.335,49.35
CLK: C47.2 D4.5 J4.C3 R40.2 | length 16
  Sig/Pwr/Gnd-1 w0.2: D4.5@43.845,86.2 43.945,86.3 44.434,86.3 44.7,86.566 44.7,89.008 44.817,89.125 51.555,89.125 53.155,87.525 J4.C3@53.155,87.3 54.625,87.3 54.8,87.125 C47.2@54.85,87.125 54.85,86.575 55.4,86.025 R40.2@55.4,86
CLK_: D3.6 J3.5 R26.1 R36.2 | length 67.5
  Sig/Pwr/Gnd-1 w0.177: v1(100.253,56.013) 100.253,56.757 R36.2@100.271,56.775
  Sig/Pwr/Gnd-3 w0.177: v1(100.253,56.013) 100.395,56.155 v1(100.395,65.775)
  Sig/Pwr/Gnd-4 w0.177: v1(100.395,65.775) 101.075,66.455 101.075,86.8 100.282,87.593 100.282,91.432 100.925,92.075 100.925,96.602 v1(101.757,97.434)
  Sig/Pwr-6 w0.177: v1(101.757,97.434) 101.75,97.441 R26.1@101.75,97.9 101.7,97.95 100.225,97.95 98.132,95.857 98.132,93.893 98.525,93.499 98.525,91.965 99.04,91.45 D3.6@99.425,91.45 99.81,91.45 99.922,91.562 99.922,91.818 100.025,91.922 102.488,91.922 103.854,93.288 103.854,93.509 105.221,94.876 107.276,94.876 109.2,96.8 J3.5@109.2,98.375
CMD: D2.1 J3.3 R27.1 R37.2 | length 58
  Sig/Pwr/Gnd-1 w0.177: v1(102.02,56.071) 102.051,56.101 R37.2@102.051,56.775
  Sig/Pwr/Gnd-3 w0.177: v1(102.025,63.925) 102.025,83.382 v1(103.74,85.097) ; v1(103.982,94.927) 103.982,96.132 105.825,97.975 110.775,97.975 110.997,97.753 111.125,97.625 111.125,97.591 111.138,97.578 111.138,97.387 v1(111.2,97.325)
  Sig/Pwr/Gnd-4 w0.177: v1(102.02,56.071) 102.02,63.92 v1(102.025,63.925) ; v1(103.74,85.097) 101.743,87.093 101.743,94.643 102.35,95.25 103.659,95.25 v1(103.982,94.927)
  Sig/Pwr-6 w0.177: D2.1@101.165,94.325 103.38,94.325 v1(103.982,94.927) ; R27.1@103.7,84.4 103.74,84.44 v1(103.74,85.097) ; v1(111.2,97.325) 111.2,98.175 J3.3@111.4,98.375
COMP: C6.2 C7.2 U1.6 | length 3.5
  Sig/Pwr/Gnd-1 w0.3: U1.6@47.22,58.015 48.71,58.015 48.975,57.75 C7.2@49.025,57.75 C6.2@50.6,57.75
CS: U8.12 U9.44 | length 17.3
  Sig/Pwr/Gnd-1 w0.2: U8.12@53.825,78.875 53.825,79.105 53.875,79.155 v1(54.343,79.155) ; U9.44@63.125,90.025 63.175,89.975 v1(63.975,89.975)
  Sig/Pwr-6 w0.2: v1(54.343,79.155) 55.83,79.155 63.925,87.25 63.925,89.925 v1(63.975,89.975)
DAT0: D2.6 J3.7 R31.1 R35.2 | length 72.5
  Sig/Pwr/Gnd-1 w0.177: R35.2@98.49,56.775 98.584,56.775 98.895,56.464 98.895,56.121 99.002,56.014 v1(99.002,55.927)
  Sig/Pwr/Gnd-3 w0.177: v1(98.975,82.43) 99.325,82.08 99.325,56.249 v1(99.002,55.927) ; v1(106.987,97.218) 106.987,97.131 107.25,96.868 v1(107.25,94.05)
  Sig/Pwr/Gnd-4 w0.177: v1(98.975,82.43) 98.975,94.395 99.062,94.482 99.077,94.482 99.635,95.04 v1(99.635,95.055) ; v1(106.987,97.218) 112.775,91.43 v1(112.775,85.1)
  Sig/Pwr-6 w0.177: v1(99.635,95.055) 99.635,94.437 99.524,94.325 D2.6@99.425,94.325 99.81,94.325 99.922,94.437 99.922,94.697 105.05,99.825 106.525,99.825 107,99.35 J3.7@107,98.375 107,97.231 v1(106.987,97.218) ; R31.1@112.775,84.4 v1(112.775,85.1)
DAT1: D2.5 J3.8 R30.1 R34.2 | length 74.8
  Sig/Pwr/Gnd-1 w0.2: R34.2@96.71,56.775 96.81,56.775 97.11,56.475 97.11,56.199 97.245,56.064 v1(97.245,55.983)
  Sig/Pwr/Gnd-3 w0.2: v1(97.245,55.983) 97.794,55.983 98.175,56.365 98.175,82.38 103.675,87.88 103.675,89.046 106.279,91.649 v1(106.279,96.796)
  Sig/Pwr/Gnd-4 w0.2: v1(106.279,96.796) 106.267,96.785 106.267,96.408 111.755,90.92 111.755,85.145 112.8,84.1 113.575,84.1 v1(114.575,85.1)
  Sig/Pwr-6 w0.2: D2.5@99.425,93.675 100.213,93.675 100.33,93.792 100.33,94.629 100.476,94.775 101,94.775 103.95,97.725 105.6,97.725 J3.8@105.9,98.025 ; J3.8@105.9,98.375 J3.8@105.9,98.025 ; v1(106.279,96.796) 106.279,96.817 105.9,97.196 J3.8@105.9,98.025 ; v1(114.575,85.1) 114.575,84.425 R30.1@114.6,84.4
DAT2: D2.4 J3.1 R29.1 R33.2 | length 78.1
  Sig/Pwr/Gnd-1 w0.177: v1(94.395,56.042) 94.395,56.13 94.526,56.261 94.526,56.464 94.836,56.775 R33.2@94.93,56.775
  Sig/Pwr/Gnd-3 w0.177: v1(103.145,88.1) 100.354,90.891 v1(100.354,92.459) 100.354,94.854 105.875,100.375 111.45,100.375 113.625,98.2 v1(113.625,97.35)
  Sig/Pwr/Gnd-4 w0.177: v1(94.395,56.042) 94.395,55.52 93.525,54.65 92.45,54.65 91.475,55.625 91.475,63.125 99.8,71.45 99.8,91.905 v1(100.354,92.459) ; v1(103.145,88.1) 103.145,87.505 v1(105.525,85.125)
  Sig/Pwr-6 w0.177: D2.4@99.425,93.025 99.45,93.05 100.175,93.05 100.292,92.933 100.292,92.521 v1(100.354,92.459) ; R29.1@105.5,84.4 105.525,84.425 v1(105.525,85.125) ; J3.1@113.6,98.375 113.625,98.35 v1(113.625,97.35)
DAT3: D2.3 J3.2 R28.1 R32.2 | length 66.3
  Sig/Pwr/Gnd-1 w0.177: v1(93.15,56.1) R32.2@93.15,56.775
  Sig/Pwr/Gnd-3 w0.177: v1(102.772,92.939) 102.125,93.585 102.125,95.275 106.15,99.3 110.775,99.3 v1(112.7,97.375)
  Sig/Pwr/Gnd-4 w0.177: v1(93.15,56.1) 93.15,56.775 106.05,69.675 106.05,83.825 v1(107.35,85.125) 107.85,85.625 107.85,89.8 105.446,92.204 102.971,92.204 102.772,92.403 v1(102.772,92.939)
  Sig/Pwr-6 w0.177: D2.3@101.165,93.025 101.208,92.982 102.729,92.982 v1(102.772,92.939) ; R28.1@107.325,84.4 107.35,84.425 v1(107.35,85.125) ; J3.2@112.5,98.375 112.7,98.175 v1(112.7,97.375)
DBG_RXD: U4.11 uart_debug.02 | length 62.5
  Sig/Pwr/Gnd-1 w0.177: U4.11@77.875,72.2 77.905,72.17 79.415,72.17 v1(79.445,72.141)
  Sig/Pwr/Gnd-3 w0.177: uart_debug.02@40.5,43.775 40.5,44.875 45.718,50.093 53.753,50.093 54.154,49.693 62.194,49.693 62.595,50.093 69.168,50.093 82.225,63.15 82.225,68.35 79.445,71.13 v1(79.445,72.141)
DBG_TXD: U4.12 uart_debug.03 | length 69.8
  Sig/Pwr/Gnd-1 w0.177: v1(76.625,71.473) 76.625,71.386 77.111,70.9 U4.12@77.875,70.9
  Sig/Pwr/Gnd-3 w0.177: uart_debug.03@43.04,43.775 43.075,43.81 43.075,45.625 45.8,48.35 73.9,48.35 76.5,50.95 76.5,55.425 83.35,62.275 83.35,69.675 79.675,73.35 78.175,73.35 76.75,71.925 76.75,71.685 76.625,71.56 v1(76.625,71.473)
EC_PWR: R15.1 U4.21 | length 5.5
  Sig/Pwr/Gnd-1 w0.177: R15.1@84.55,56.9 84.55,57.703 86.794,59.947 86.794,61.331 U4.21@86.675,61.45
EC_RST: R12.1 U4.20 | length 9.5
  Sig/Pwr/Gnd-1 w0.177: R12.1@79.325,56.9 79.325,58.15 80.275,59.1 84.5,59.1 85.375,59.975 U4.20@85.375,61.45
EC_USB_N: D8.5 J5.A7 J5.B7 U4.70 | length 64
  Sig/Pwr/Gnd-1 w0.194: J5.B7@71.709,47.625 71.709,48.778 71.618,48.869 71.618,49.518 71.8,49.7 72.625,49.7 72.766,49.559 72.766,49.209 v1(72.825,49.15) ; J5.A7@72.709,47.625 72.656,47.678 72.656,48.355 72.619,48.392 72.619,48.862 72.825,49.067 v1(72.825,49.15) ; D8.5@74.98,50 73.756,50 72.906,49.15 v1(72.825,49.15) ; U4.70@86.675,89.95 86.675,89.263 87.165,88.773 87.165,88.48 87.175,88.47 87.175,88.287 86.995,88.108 v1(86.995,88.025)
  Sig/Pwr/Gnd-4 w0.185: v1(72.825,49.15) 72.825,49.235 72.702,49.359 72.702,53.352 89.585,70.235 89.585,90.529 88.979,91.135 87.574,91.135 87.092,90.653 87.092,88.291 87.055,88.254 87.055,88.085 v1(86.995,88.025)
EC_USB_P: D8.6 J5.A6 J5.B6 U4.69 | length 62.3
  Sig/Pwr/Gnd-1 w0.194: v1(72.145,49.15) 72.145,49.067 72.299,48.914 72.299,48.392 72.262,48.355 72.262,47.678 J5.A6@72.209,47.625 72.209,46.691 72.495,46.405 72.905,46.405 73.156,46.656 73.156,47.572 J5.B6@73.209,47.625 73.262,47.678 73.262,48.427 74.185,49.35 D8.6@74.98,49.35 ; v1(87.675,88.025) 87.675,88.108 87.495,88.287 87.495,88.603 87.485,88.613 87.485,88.773 87.975,89.263 U4.69@87.975,89.95
  Sig/Pwr/Gnd-4 w0.185: v1(72.145,49.15) 72.205,49.21 72.205,49.405 72.216,49.416 72.216,53.552 89.1,70.436 89.1,90.328 88.778,90.65 87.775,90.65 87.578,90.453 87.578,88.291 87.615,88.254 87.615,88.085 v1(87.675,88.025)
EC_VUSB: C54.1 D9.A FB2.1 TP11.1
  other v1: 65.575,51.4 64.825,52.288 68.4,52.288 66.25,52.925 67.775,53.35 64.825,53.475 39.325,67.5 38.8,68.25 39.975,68.25
EN: R6.1 R8.2 U3.3 | length 6.2
  Sig/Pwr/Gnd-1 w0.3: U3.3@58.144,57.7 58.454,57.7 59.425,58.671 59.425,60.4 58.675,61.15 R6.1@58.675,61.25 58.688,61.263 60.313,61.263 R8.2@60.325,61.275
EN_5V: C16.2 U2.1 U2.12 | length 7.7
  Sig/Pwr/Gnd-1 w0.2: v3(56.675,71.125) 56.7,71.1 57.557,71.1 57.575,71.082 U2.1@57.575,71.075 57.575,70.6 ; v3(58.462,74.514) 58.462,74.406 58.567,74.3 58.567,73.883 U2.12@58.575,73.875
  Sig/Pwr/Gnd-1 w0.3: C16.2@56.75,69.85 57.399,69.85 57.575,70.026 57.575,70.6
  Sig/Pwr-6 w0.2: v3(56.675,71.125) 57.375,71.825 57.375,73.427 v3(58.462,74.514)
EN_TP: R1.1 R3.2 U1.3 | length 10
  Sig/Pwr/Gnd-1 w0.3: R1.1@35.25,57.85 R3.2@35.25,56.225 38.724,56.225 38.9,56.401 38.9,57.475 39.44,58.015 U1.3@42.28,58.015
FB: R7.2 R9.1 U2.3 | length 5.4
  Sig/Pwr/Gnd-1 w0.2: 58.05,70.475 58.1,70.525 58.228,70.525 58.555,70.852 58.555,70.864 58.575,70.884 U2.3@58.575,71.075
  Sig/Pwr/Gnd-1 w0.3: R7.2@57.6,66.15 R9.1@57.6,68.05 57.788,68.238 57.788,69.35 58.05,69.612 58.05,70.475
FIL_OUT: L6.1 U6.7 | length 1
  Sig/Pwr/Gnd-1 w0.2: U6.7@115.675,65.494 116.307,65.494 116.5,65.3 L6.1@116.5,65.225
GND: A1.2 A2.2 C2.1 C3.1 C4.1 C5.1 C7.1 C8.1 C9.1 C10.1 C11.1 C12.1 C13.1 C14.1 C15.1 C16.1 C17.1 C18.1 C19.1 C20.1 C21.1 C22.1 C23.1 C24.2 C25.2 C26.1 C27.2 C28.1 C30.1 C31.1 C32.1 C33.1 C34.1 C35.1 C38.1 C39.1 C40.1 C41.1 C42.1 C43.1 C44.1 C45.1 C46.1 C47.1 C48.1 C49.1 C50.1 C51.2 C52.2 C53.2 C54.2 C55.1 C56.2 C57.1 C58.1 C59.1 C60.1 C61.2 C62.1 C63.1 C64.1 C65.1 C66.1 D1.A D2.2 D3.2 D4.2 D5.A D6.A D7.2 D8.2 D11.2 J1.2 J2.1 J3.6 J4.0 J4.C5 J5.A1B12 J5.B1A12 J5.SH J6.A1B12 J6.B1A12 J6.SH J7.5 J8.3 JACK1.1 L4.2 L7.1 nReset.3 nReset.4 nRF_debug.04 Q1.E Q2.E Q3.2 R3.1 R4.1 R5.1 R8.1 R9.2 R11.1 R13.1 R14.1 R16.1 R19.1 R20.2 R21.2 R22.1 R42.1 R43.1 R44.1 R45.1 R48.2 R53.2 U1.7 U2.2 U2.13 U2.15 U2.16 U2.17 U2.18 U2.19 U2.20 U2.21 U2.22 U2.23 U2.24 U2.25 U2.26 U2.27 U2.28 U2.29 U2.30 U3.2 U4.8 U4.9 U4.10 U4.19 U4.22 U4.36 U4.46 U4.48 U4.50 U4.51 U4.52 U4.53 U4.54 U4.56 U4.72 U5.11 U6.1 U6.4 U6.6 U6.9 U6.11 U7.2 U8.2 U8.3 U8.6 U8.7 U9.1 U9.25 U9.37 U10.8 U10.21 U10.22 U10.23 U10.24 U10.25 U10.26 U10.27 U10.28 U10.29 U10.30 uart_debug.04 Y1.2 Y1.4 | length 139.8
  Sig/Pwr/Gnd-1 w0.2: R53.2@34.65,82.3 34.65,83.15 v2(34.7,83.2) ; C43.1@35.475,79.45 35.5,79.425 v2(35.5,78.625) ; C18.1@104.7,94.15 104.725,94.125 105.475,94.125 v2(105.5,94.1) ; U4.36@106.175,61.45 106.188,61.463 106.188,63.038 v3(106.2,63.05) ; v3(110.775,61.75) C40.1@111.425,61.75 ; v2(111.445,64.075) 111.445,64.82 L7.1@111.475,64.85 C42.1@111.475,65.875 112.425,65.875 112.807,65.494 U6.4@113.3,65.494
  Sig/Pwr/Gnd-1 w0.25: v4(35.6,71.7) 36.425,71.7 R48.2@36.475,71.65 ; Y1.2@38.3,81.475 38.354,81.529 v1(39.339,81.529) ; C60.1@38.85,82.65 38.856,82.656 38.856,83.19 v1(38.862,83.196) ; v1(39.5,79.75) 39.525,79.775 Y1.4@40.5,79.775 ; v1(42.1,80.5) 42.12,80.52 42.785,80.52 U10.8@42.79,80.525 U10.29@43.725,80.525